# Altium PCB NE006NG.pcbdoc
Units mm, origin at the board's own origin, x right, y up, seen from the top; angles counter-clockwise.
Board outline 18.15 x 19.85 mm, 2 copper layers (Top Layer, Bottom Layer), stack 0 mm thick; 1 components, 0 nets, 9 pads, 0 vias.
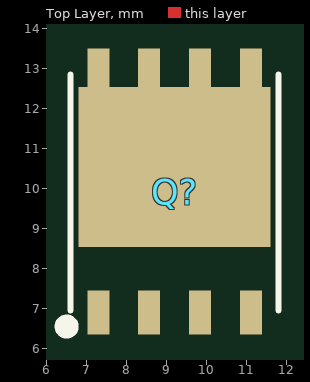
[diagram p0: Top Layer view]
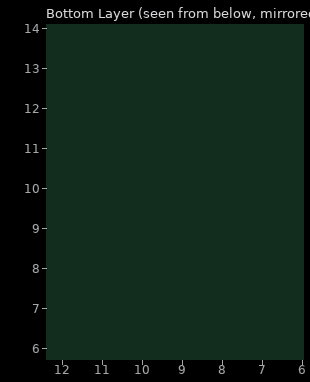
[diagram p1: Bottom Layer view, seen from below]

## Layer stack, top to bottom
Top Layer: signal copper (thickness not stored)
Bottom Layer: signal copper (thickness not stored)

## Board outline
18.15,0 0,0 0,19.85 18.15,19.85

## Components (designator, comment, footprint, x,y, rotation, side; value= is the part's Value field where it differs from the comment)
Q? "NE006NG" DFN5X6-8_L5.8-W5.0-P1.27-LS6.2-BL-EP 9.2,9.925 r0 top

## Footprints (in the part's own frame and the unit in brackets; to place one, negate y for a bottom-side part, rotate by r counter-clockwise, add the part's x,y. Pads: shape width x height; smd on the part's side, far side on the other; paste and mask are expansions set on the pad)
DFN5X6-8_L5.8-W5.0-P1.27-LS6.2-BL-EP [mm]
  rect 0.55x1.1 smd paste-100 mask+0.05: 1(-1.905,-3.025) 2(-0.635,-3.025) 3(0.635,-3.025) 4(1.905,-3.025) 5(1.905,3.025) 6(0.635,3.025) 7(-0.635,3.025) 8(-1.905,3.025)
  rect 4.8x4 smd paste-100 mask+0.05: 8(0,0.61)
  silkscreen extent -2.85,-3.53 2.6,2.92

## Nets (pads, with @x,y where several pads share a name; then routed paths per layer and width w, separated by ;. In a path a pad name is that pad's centre, name@x,y a point inside that pad or via, vN(x,y) a via of type N, cw(c..) or ccw(c..) an arc to the next point about the centre after c; other vN are vias at no path point)
pads on no net: Q?.1 Q?.2 Q?.3 Q?.4 Q?.5 Q?.6 Q?.7 Q?.8